# Altium PCB PCB1.PcbDoc
Units mil, origin at the board's own origin, x right, y up, seen from the top; angles counter-clockwise.
Board outline 3401.25 x 3741.25 mil, 2 copper layers (Top Layer, Bottom Layer); 29 components, 44 nets, 178 pads, 45 vias.
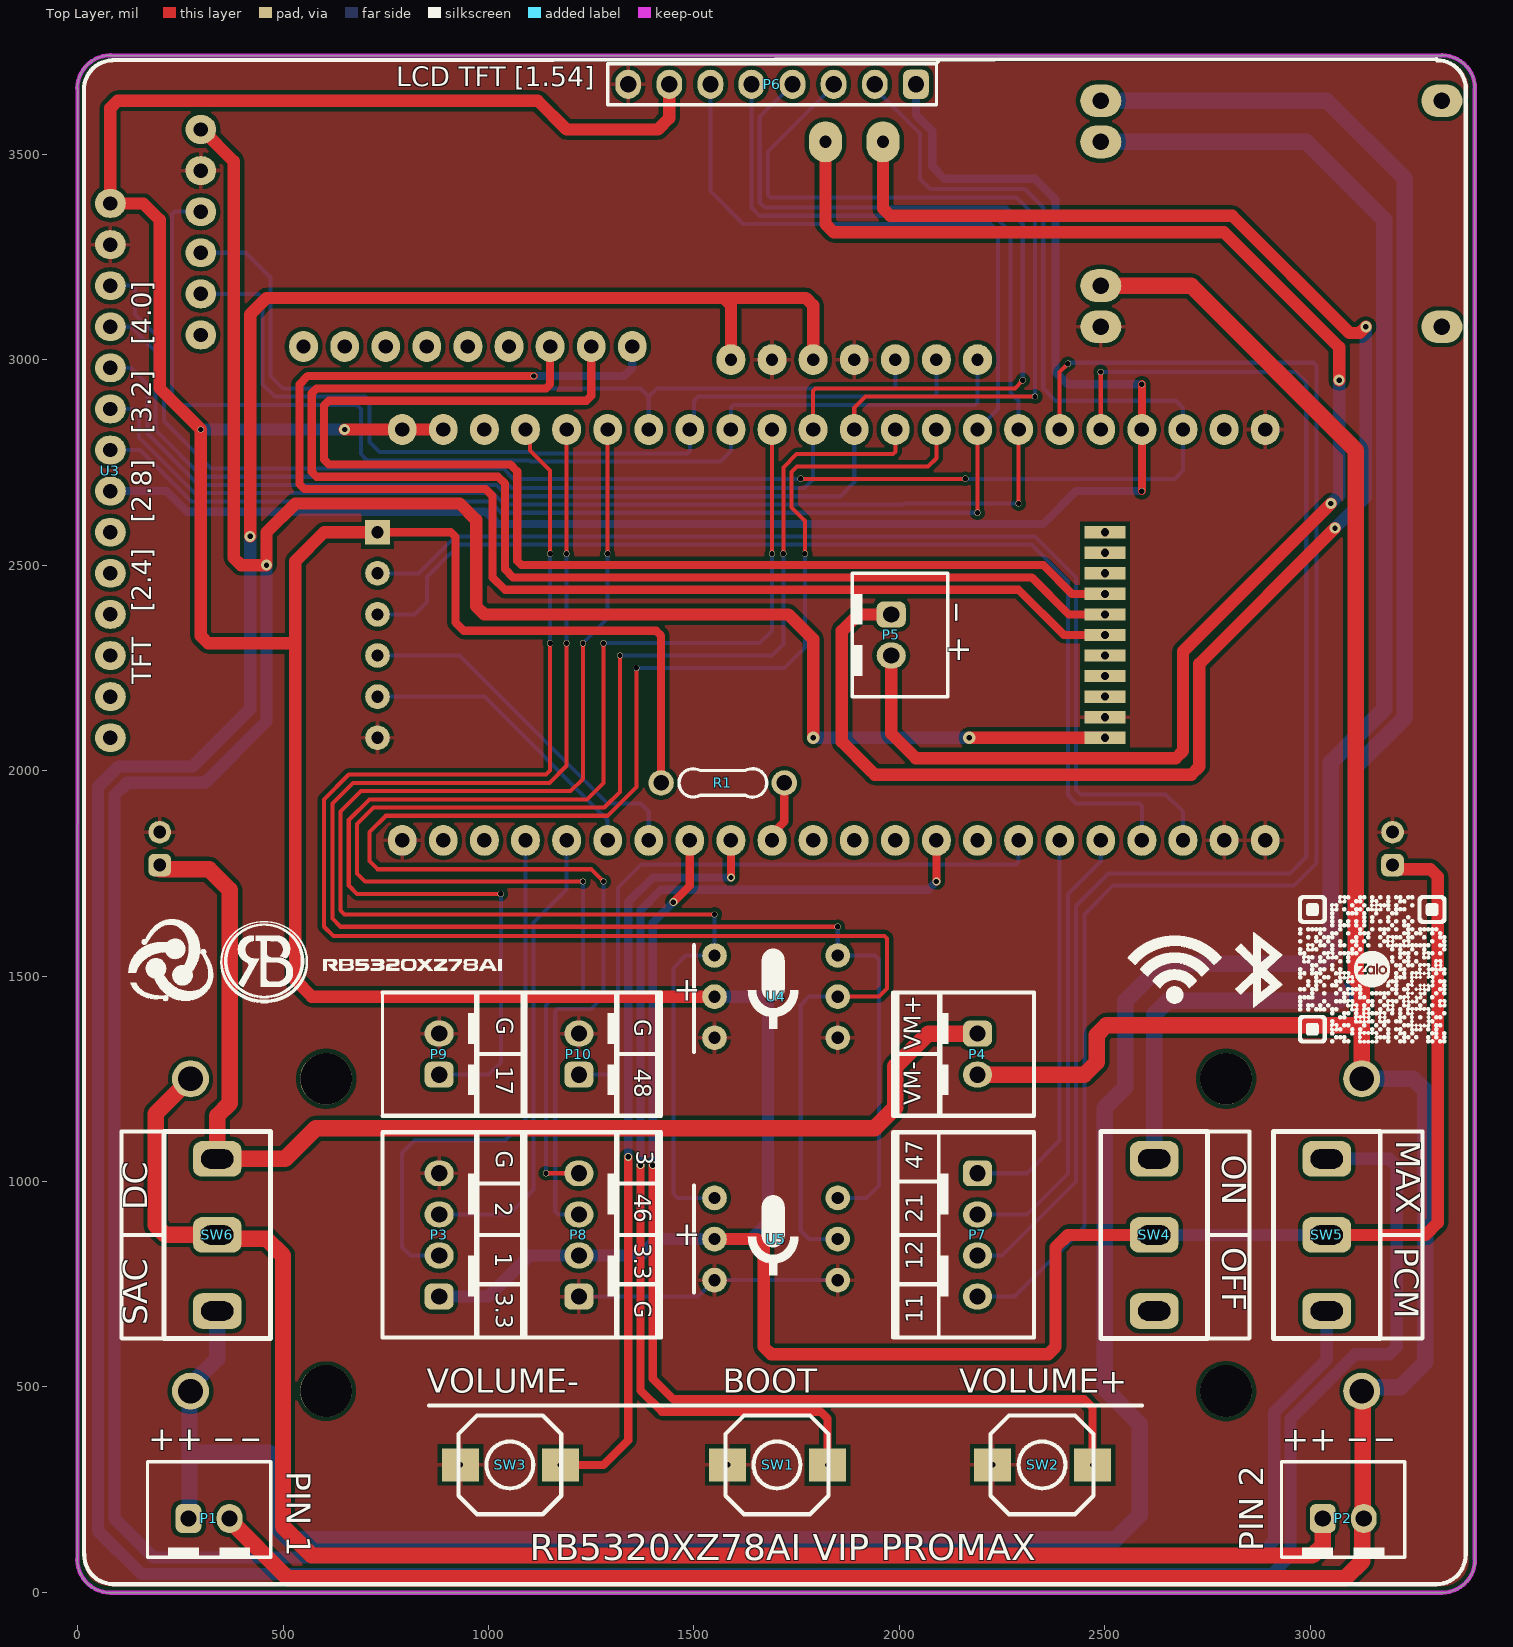
[diagram p0: Top Layer view]
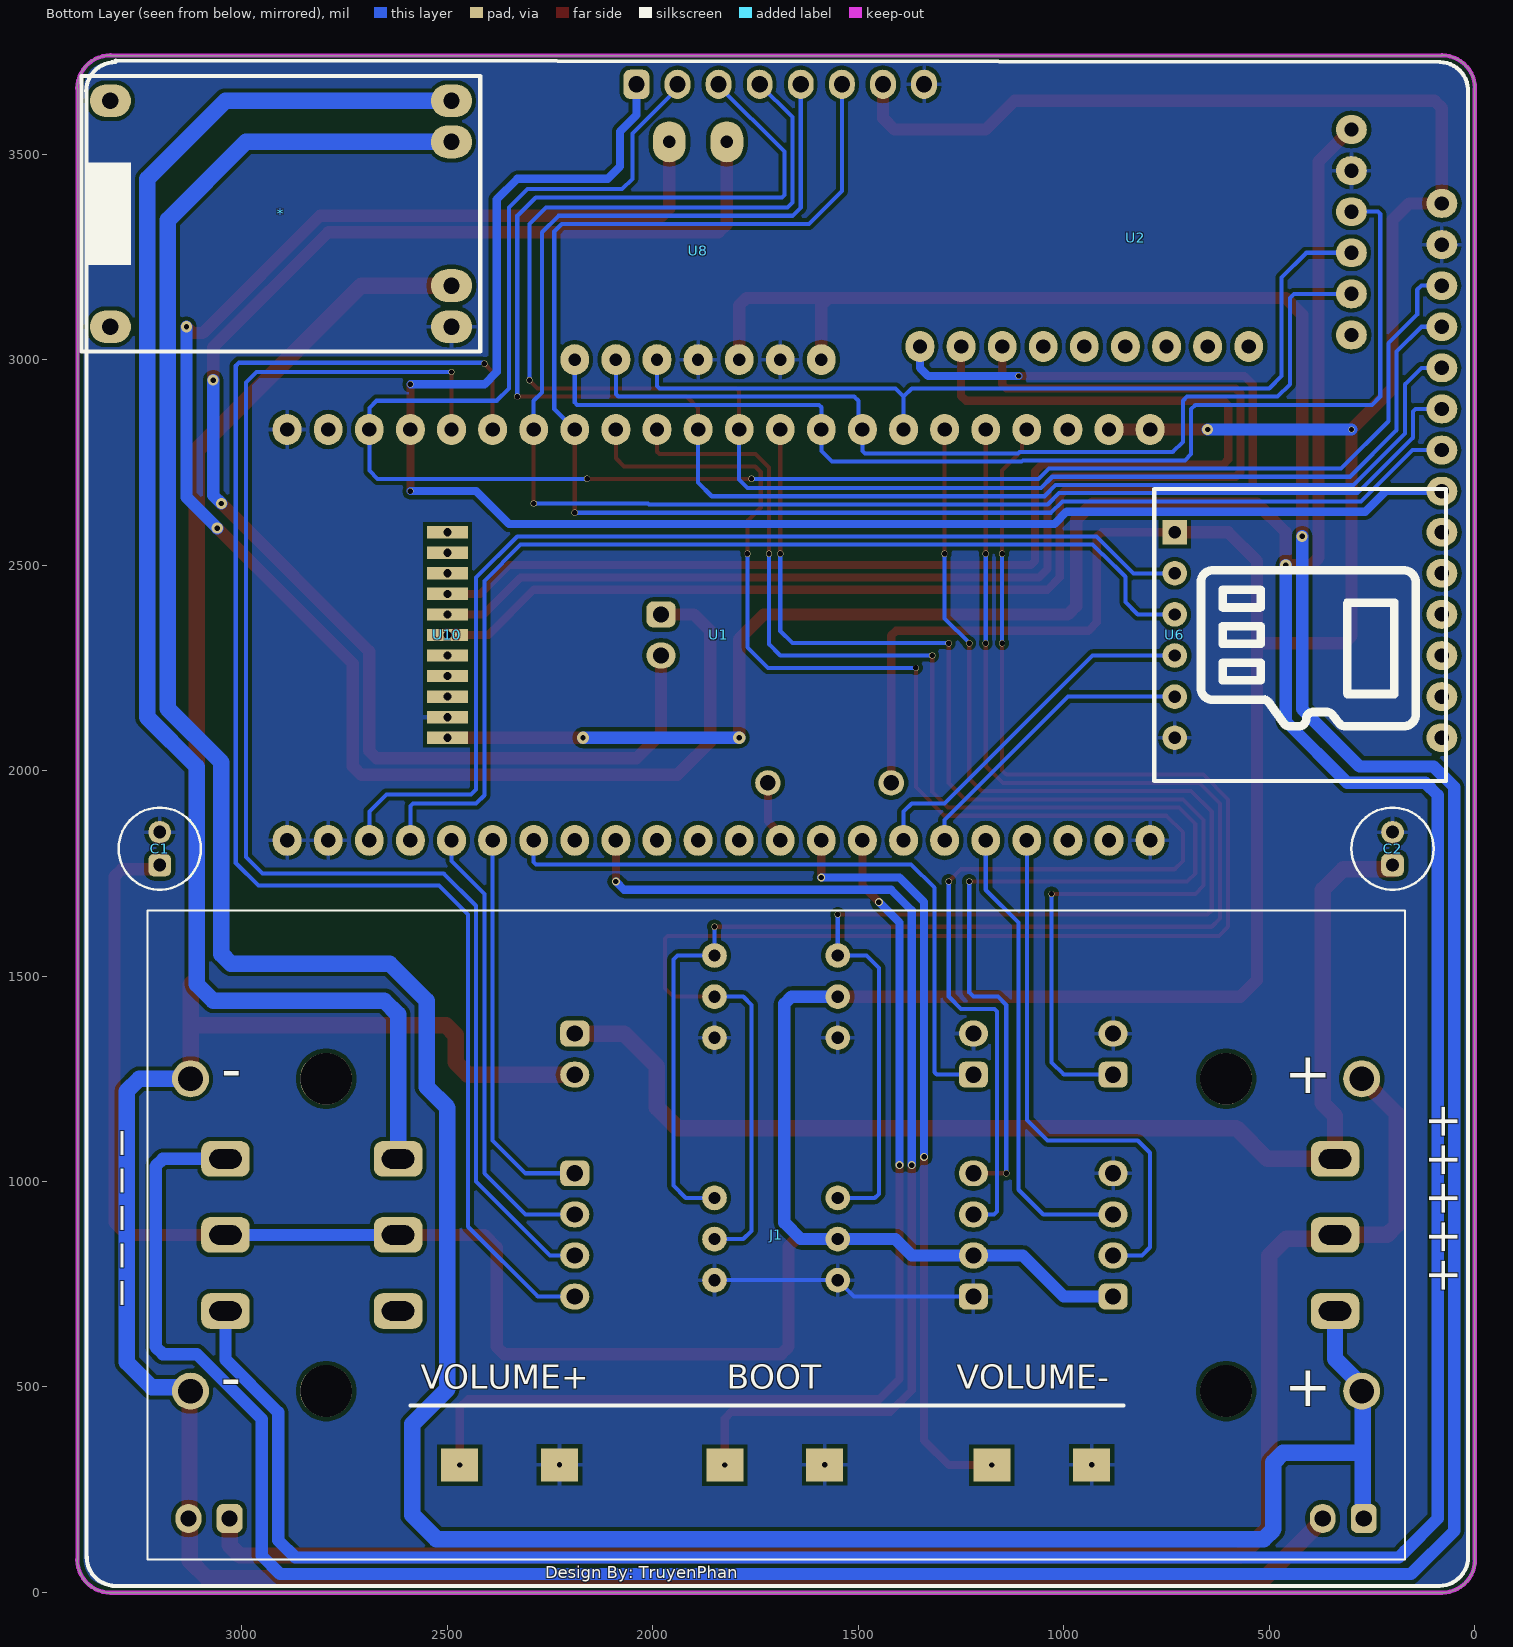
[diagram p1: Bottom Layer view, seen from below]

## Layer stack, top to bottom
Top Solder: solder mask 0.4, Solder Resist, Dk 3.5
Top Layer: signal copper 1.4
Dielectric 1: dielectric 12.6, FR-4, Dk 4.8
Bottom Layer: signal copper 1.4
Bottom Solder: solder mask 0.4, Solder Resist, Dk 3.5

## Board outline
-0.62,80 ccw(c80,80) 80,-0.62 3320,-0.62 ccw(c3320,80) 3400.62,80 3400,80 3400,3660 3400.62,3660 ccw(c3320,3660) 3320,3740.62 3320,3740 80,3740 80,3740.62 ccw(c80,3660) -0.62,3660 0,3660

## Design rules (kind name [scope] priority, off if disabled: settings)
Clearance [All] p1: gap=10 ignorepadtopadclearanceinfootprint=FALSE except(0: Arc-Hole Track-Hole SMDPad-Hole THPad-Hole Via-Hole Fill-Hole Poly-Hole Region-Hole Text-Hole)
PolygonConnect [All] p1: connectstyle=Relief reliefconductorwidth=10 reliefentries=4 polygonreliefangle="90 Angle" airgapwidth=10
RoutingVias [All] p1: holewidth=13 width=15 viastyle="Through Hole" minholewidth=13 minwidth=15 maxholewidth=13 maxwidth=15
SolderMaskExpansion [IsVia] p1: expansion=-1 istentingtop=FALSE
Width [All] p1: maxlimit=40 minlimit=10 preferedwidth=20
30 further rules are at their usual default settings.

## Components (designator, comment, footprint, x,y, rotation, side; value= is the part's Value field where it differs from the comment)
* "MACH_SAC_5V" TP4056 3320,3080 r90 bottom
C1 "C" CYL/D.200/LS.75 3200,1810 r90 bottom
C2 "C" CYL/D.200/LS.75 200,1810 r90 bottom
J1 "BK-18650-PC4" 18650-PC4 1700,870 r0 bottom
P1 "PIN" HDR/Header/2/BOX 320,180 r90 top
P2 "PIN" HDR/Header/2/BOX 3080,180 r90 top
P3 "HC_SR04" HDR/Header/4/BOX 880,870 r90 top
P4 "PWR_DC" HDR/Header/2/BOX 2190,1310 r0 top
P5 "LOA" HDR/Header/2/BOX 1980,2330 r0 top
P6 "Header 8" HDR/Header/8 1690,3670 r180 top
P7 "PWM" HDR/Header/4/BOX 2190,870 r270 top
P8 "OLED" HDR/Header/4/BOX 1220,870 r90 top
P9 "LED1" HDR/Header/2/BOX 880,1310 r180 top
P10 "LED2" HDR/Header/2/BOX 1220,1310 r180 top
R1 "10K" "R 1/4W/300" 1420,1970 r0 top
SW1 "Button 2pin" Button2Psilicon 1582.05,310.37 r0 top
SW2 "Button 2pin" Button2Psilicon 2227.05,310.37 r0 top
SW3 "Button 2pin" Button2Psilicon 932.05,310.37 r0 top
SW4 "POWER" SW/3/SPDT/SS12D10 2620,870 r90 top
SW5 "LOA_CHANGE" SW/3/SPDT/SS12D10 3040,870 r90 top
SW6 "SPL" SW/3/SPDT/SS12D10 340,870 r90 top
U1 "ESP32_S3_MODULE" ESP32_S3_MODULE 2890,2830 r180 bottom
U2 "PCM5102" PCM5102 1350,3032 r90 bottom
U3 "TFT28" "TFT - duplicate" 80,2080 r90 top
U4 "MIC_IMP441" IMP441 1550,1550 r0 top
U5 "MIC_IMP441" IMP441 1550,960 r0 top
U6 "SD CARD" SDCARD_MODULE 730,2580 r180 bottom
U8 "MAX98357" MAX98357 2190,3000 r180 bottom
U10 "BLUETOOTH" BLE 2500,2080 r90 bottom

## Footprints (in the part's own frame and the unit in brackets; to place one, negate y for a bottom-side part, rotate by r counter-clockwise, add the part's x,y. Pads: shape width x height; smd on the part's side, far side on the other; paste and mask are expansions set on the pad)
18650-PC4 [mil]
  round 90 hole 60: +1(-1425,380) +2(-1425,-380) -1(1425,380) -2(1425,-380)
  round 126 hole 126 unplated: ""(-1095,-380) ""(-1095,380) ""(1095,-380) ""(1095,380)
  silkscreen extent -1530,-790 1530,790, body extent -1530,-792 1530,792, height 974
BLE [mil]
  rect 30x100 hole 20: 0(0,0) 1(50,0) 2(100,0) 3(150,0) 4(200,0) 5(250,0) 6(300,0) 7(350,0) 8(400,0) 9(450,0) 10(500,0)
  body extent -45,-29 546,875, height 116
Button2Psilicon [mil]
  rect 90x80 hole 13: 1(0,0) 2(242.95,-0.37)
  silkscreen extent -5,-120 245,120, body extent -4,-116 244,116, height 195
CYL/D.200/LS.75 [mm]
  rrect50% 1.4x1.4 hole 0.8: 1(-1.016,0)
  round 1.4 hole 0.8: 2(1.016,0)
  silkscreen extent -2.54,-2.54 2.54,2.54, body extent -2.5,-2.5 2.5,2.5, height 11
ESP32_S3_MODULE [mil]
  oval 70x75 hole 35: 0(0,0) 1(100,0) 2(200,0) 3(300,0) 4(400,0) 5(500,0) 6(600,0) 7(700,0) 8(800,0) 9(900,0) 10(1000,0) 11(1100,0) 12(1200,0) 13(1300,0) 14(1400,0) 15(1500,0) 16(1600,0) 17(1700,0) 18(1800,0) 19(1900,0) 20(2000,0) 21(2100,0) 22(0,-1000) 23(100,-1000) 24(200,-1000) 25(300,-1000) 26(400,-1000) 27(500,-1000) 28(600,-1000) 29(700,-1000) 30(800,-1000) 31(900,-1000) 32(1000,-1000) 33(1100,-1000) 34(1200,-1000) 35(1300,-1000) 36(1400,-1000) 37(1500,-1000) 38(1600,-1000) 39(1700,-1000) 40(1800,-1000) 41(1900,-1000) 42(2000,-1000) 43(2100,-1000)
  body extent -100,-1050 2421,50, height 426
HDR/Header/2/BOX [mm]
  rrect50% 1.8x1.6 hole 1: 1(0,1.27)
  oval 1.8x1.6 hole 1: 2(0,-1.27)
  silkscreen extent -2.41,-3.81 3.5,3.81, body extent -2.35,-3.7 3.4,3.7, height 7
HDR/Header/4/BOX [mm]
  rrect50% 1.6x1.8 hole 1: 1(-3.81,0)
  oval 1.6x1.8 hole 1: 2(-1.27,0) 3(1.27,0) 4(3.81,0)
  silkscreen extent -6.35,-2.41 6.35,3.5, body extent -6.25,-2.3 6.25,3.4, height 7
HDR/Header/8 [mm]
  rrect50% 1.6x1.8 hole 1: 1(-8.89,0)
  oval 1.6x1.8 hole 1: 2(-6.35,0) 3(-3.81,0) 4(-1.27,0) 5(1.27,0) 6(3.81,0) 7(6.35,0) 8(8.89,0)
  silkscreen extent -10.29,-1.4 10.16,1.27, body extent -10.16,-1.27 10.16,1.27, height 8.89
IMP441 [mil]
  round 60 hole 30: 0(0,0) 1(0,-100) 2(0,-200) 3(300,0) 4(300,-100) 5(300,-200)
  body extent -122,-382 420,178, height 411
MAX98357 [mil]
  oval 70x75 hole 30: 0(0,0) 1(100,0) 2(200,0) 3(300,0) 4(400,0) 5(500,0) 6(600,0)
  oval 80x100 hole 30: 7(230,530) 8(370,530)
  body extent -54,-99 654,665, height 656
PCM5102 [mil]
  oval 75x70 hole 35: 0(0,0) 1(0,-100) 2(0,-200) 3(0,-300) 4(0,-400) 5(0,-500) 6(0,-600) 7(0,-700) 8(0,-800)
  oval 70x75 hole 35: 9(28,-1050) 10(128,-1050) 11(228,-1050) 12(328,-1050) 13(428,-1050) 14(528,-1050)
  body extent -66,-1112 686,140, height 529
"R 1/4W/300" [mil] "Through hole resitor, axial 300mils, 1/4W"
  round 62 hole 38: 1(0,0) 2(300,0)
  silkscreen extent 44,-35 257,35, body extent -12,-47 312,47, height 97
SDCARD_MODULE [mil]
  rect 60x60 hole 30: 1(0,0)
  round 60 hole 30: 2(0,-100) 3(0,-200) 4(0,-300) 5(0,-400) 6(0,-500)
  silkscreen extent -50,-605 660,105, body extent -51,-606 761,107, height 133
SW/3/SPDT/SS12D10 [mm]
  rrect50% 2.2x3 hole 1.2 slot 2 at 90 deg: 1(-4.7,0) 2(0,0) 3(4.7,0)
  silkscreen extent -6.4,-3.3 6.4,3.3, body extent -6.4,-3.3 6.35,3.8, height 12.5
"TFT - duplicate" [mil]
  oval 70x75 hole 35: 1(1300,0) 2(1200,0) 3(1100,0) 4(1000,0) 5(900,0) 6(800,0) 7(700,0) 8(600,0) 9(500,0) 10(400,0) 11(300,0) 12(200,0) 13(100,0) 14(0,0)
  body extent -335,-3311 1635,75, height 332
TP4056 [mil]
  oval 80x100 hole 40: 0(0,0) 1(550,0) 2(0,-830) 3(100,-830) 4(450,-830) 5(550,-830)
  silkscreen extent -60,-900 610,70, body extent -66,-1044 620,109, height 163

## Part data
C1 C2: library part Capacitor, "Capacitor pol"
J1: "Battery Holder (Open) 18650 2 Cell PC Pin", Package=None, Check_prices=https://www.snapeda.com/parts/BK-18650-PC4/Memory+Protection+Devices/view-part/?ref=eda, MF="MPD (Memory Protection Devices)", MP=BK-18650-PC4, SnapEDA_Link=https://www.snapeda.com/parts/BK-18650-PC4/Memory+Protection+Devices/view-part/?ref=snap
P1 P2 P4 P5 P9 P10: library part "Header 2", "Header, 2-Pin"
P3 P7 P8: library part "Header 4", "Header, 4-Pin"
P6: "Header, 8-Pin"
R1: library part Resistor, "Resistor"
SW1 SW2 SW3: library part "Silicone 2P button SMD"
SW4 SW5 SW6: library part "SW SPDT"
U6: library part "SD Card Module"

## Via types
v1: diameter 15, hole 13, Top Layer to Bottom Layer, 30 vias
v2: diameter 27, hole 13, Top Layer to Bottom Layer, 7 vias
v3: diameter 19, hole 13, Top Layer to Bottom Layer, 6 vias
v4: diameter 30, hole 13, Top Layer to Bottom Layer, 2 vias

## Nets (pads, with @x,y where several pads share a name; then routed paths per layer and width w, separated by ;. In a path a pad name is that pad's centre, name@x,y a point inside that pad or via, vN(x,y) a via of type N, cw(c..) or ccw(c..) an arc to the next point about the centre after c; other vN are vias at no path point)
3.3: C1.1 P3.1 P6.7 P8.2 R1.1 SW4.2 SW5.2 U1.20 U1.21 U3.1 U4.1 U5.1 U6.1 | length 12098.3
  Top Layer w20: U6.1 908.28,2580 920,2568.28 920,2360 940,2340 1408.28,2340 1420,2328.28 R1.1
  Top Layer w30: v2(650,2830) U1.21 U1.20 ; U6.1 600,2580 530,2510 530,2310 ; P6.7 1440,3587.57 1412.43,3560 1190,3560 1120,3630 97.57,3630 80,3612.43 U3.1 160,3380 200,3340 200,2930 v1(300,2830) 300,2327.57 317.57,2310 530,2310 ; U5.1 1652.43,860 1670,842.43 1670,597.57 1687.57,580 2362.43,580 2380,597.57 2380,840 2410,870 SW4.2 ; U4.1 570,1450 530,1490 530,2310 ; SW5.2 3280,870 3310,900 3310,1742.43 3292.43,1760 C1.1@3200,1760
  Bottom Layer w30: v1(300,2830) v2(650,2830) ; P3.1 1000,720 1100,820 P8.2 1370,820 1410,860 U5.1 1640,860 1680,900 1680,1432.43 1662.43,1450 U4.1 ; SW4.2 SW5.2
3.3MAX: SW5.3 U8.4 U8.6 | length 9146.5
  Top Layer w30: v2(420,2570) 420,3110 460,3150 1572.43,3150 ; U8.6 1590,3132.43 1572.43,3150 ; U8.4 1790,3132.43 1772.43,3150 1572.43,3150
  Bottom Layer w30: v2(420,2570) 420,2150 280,2010 100,2010 50,1960 50,150 155,45 2907.43,45 2951.72,89.29 2951.72,421.72 3110,580 3192.43,580 3210,597.57 3210,1037.47 3192.43,1055.04 SW5.3
3.3PCM: SW5.1 U2.14 U10.0 | length 9887.3
  Top Layer w30: U2.14 302.5,3560 380,3482.5 380,2517.57 397.57,2500 v2(460,2500) 460,2580 530,2650 930,2650 970,2610 970,2400 990,2380 1730,2380 1790,2320 v4(1790,2080) ; v4(2170,2080) U10.0
  Bottom Layer w30: v2(460,2500) 460,2120 310,1970 120,1970 90,1940 90,180 170.01,99.99 185,85 2870,85 2911.72,126.72 2911.72,438.28 3040,566.57 SW5.1 ; v4(1790,2080) v4(2170,2080)
AGND: U2.1 U10.7 | length 3074.8
  Top Layer w20: U2.1 1250,2911.72 1238.28,2900 611.72,2900 600,2888.28 600,2756.72 611.72,2745 1053.28,2745 1070,2728.28 1070,2510 1080,2500 2350,2500 2420,2430 U10.7
BCK: U1.14 U2.10 U8.1 | length 2342.2
  Bottom Layer w10: U2.10 440,3160 450,3150 450,2940 480,2910 700,2910 710,2900 710,2800 735,2775 1107.89,2775 1111.25,2771.64 1484.14,2771.64 1490,2777.5 U1.14 1500,2840 1500,2900 1510,2910 2084.14,2910 2090,2915.86 U8.1
BL: P6.1 U1.3 U3.8 | length 4028.4
  Top Layer w20: v1(2590,2680) U1.3 v1(2590,2940)
  Bottom Layer w20: U3.8 216.36,2680 266.36,2630 524.14,2630 992.9,2630 1022.9,2600 2350,2600 2430,2680 v1(2590,2680) ; P6.1 2040,3595.36 2080,3555.36 2080,3470 2110,3440 2330,3440 2380,3390 2380,2970 2410,2940 v1(2590,2940)
BOOT: SW1.2 U1.30 | length 2613.9
  Top Layer w20: v3(1370,1040) 1370,491.72 1421.72,440 1808.28,440 1825,423.28 SW1.2 ; v3(2090,1730) U1.30
  Bottom Layer w20: v3(1370,1040) 1370,1660 1420,1710 2070,1710 v3(2090,1730)
CS: P6.2 U1.2 U3.3 | length 4516.1
  Top Layer w10: v1(1760,2710) v1(2160,2710)
  Bottom Layer w10: U3.3 130,3180 140,3170 140,3110 210,3040 210,2850 325,2735 1036.39,2735 1061.39,2710 v1(1760,2710) ; P6.2 1940,3660 2050,3550 2050,3440 2075,3415 2305,3415 2350,3370 2350,2930 2380,2900 2672.5,2900 2690,2882.5 U1.2 2690,2730 2670,2710 v1(2160,2710)
DC: P6.3 U1.10 U3.5 | length 4103.1
  Top Layer w10: U1.10 1890,2882.5 1917.5,2910 v1(2330,2910)
  Bottom Layer w10: U3.5 130,2980 170,2940 170,2820 295,2695 1019.83,2695 1047.33,2667.5 1856.64,2667.5 1890,2700.86 U1.10 ; P6.3 1840,3666.06 1680,3506.06 1680,3400.86 1685.86,3395 2285,3395 2330,3350 v1(2330,2910)
DC_POWER: C2.1 P4.1 SW6.3 | length 2893
  Top Layer w40: C2.1@200,1760 320,1760 370,1710 370,1190 340,1160 SW6.3 505.04,1055.04 580,1130 1940,1130 1990,1180 1990,1280 2070,1360 P4.1
DIN: U1.15 U2.11 U8.2 | length 2130.4
  Bottom Layer w10: U2.11 410,3260 470,3200 470,2960 500,2930 1370,2930 1390,2910 ; U1.15 1390,2910 ; U8.2 1990,2935.86 1984.14,2930 1410,2930 1390,2910
GND: *.2 C1.2 C2.2 P3.4 P6.8 P8.1 P9.2 P10.2 SW1.1 SW2.1 SW3.1 U1.0 U1.22 U1.23 U1.43 U2.13 U3.2 U4.2 U4.5 U5.2 U5.5 U6.6 U8.3 U8.5 U10.1 | length 646.6
  Bottom Layer w10: P8.1 1510,720 U5.2 U5.5
GPIO_1: P3.2 U1.40 | length 1341.4
  Bottom Layer w10: P3.2 810,820 790,840 790,1070 820,1100 1040,1100 1090,1150 U1.40
GPIO_2: P3.3 U1.39 | length 1138
  Bottom Layer w10: P3.3 1050,920 1110,980 1110,1630 1190,1710 U1.39
GPIO_3: P8.4 U1.9 | length 3726.3
  Top Layer w10: v1(1140,1020) P8.4 ; v1(1230,1730) 700,1730 680,1750 680,1870 720,1910 1281.72,1910 1320,1948.28 v1(1320,2280) ; v1(1717.5,2527.5) 1717.5,2737.5 1750,2770 1984.14,2770 1990,2775.86 U1.9
  Bottom Layer w10: v1(1140,1020) 1140,1430 1160,1450 1220,1450 1230,1460 v1(1230,1730) ; v1(1320,2280) 1690,2280 1717.5,2307.5 v1(1717.5,2527.5)
GPIO_11: P7.4 U1.5 | length 3694.6
  Top Layer w10: U1.5 2390,2970 v1(2410,2990)
  Bottom Layer w10: P7.4 2280,720 2450,890 2450,1650 2520,1720 2960,1720 3015,1775 3015,2985 3007.5,2992.5 2413.85,2992.5 2411.35,2990 v1(2410,2990)
GPIO_12: P7.3 U1.4 | length 3399.7
  Top Layer w10: U1.4 v1(2490,2970)
  Bottom Layer w10: P7.3 2250,820 2430,1000 2430,1671.06 2508.94,1750 2950,1750 2990,1790 2990,2944.14 2964.14,2970 v1(2490,2970)
GPIO_17: P9.1 U1.12 | length 3020.4
  Top Layer w10: v1(1030,1700) 680,1700 660,1720 660,1880 710,1930 1240,1930 1280,1970 v1(1280,2310) ; v1(1690,2527.5) U1.12
  Bottom Layer w10: P9.1 1000,1260 1030,1290 v1(1030,1700) ; v1(1280,2310) 1660,2310 1690,2340 v1(1690,2527.5)
GPIO_19: U1.24 U6.2 | length 2647
  Bottom Layer w10: U6.2 830,2480 920,2570 2330,2570 2430,2470 2430,1954.14 2442.07,1942.07 2647.93,1942.07 2690,1900 U1.24
GPIO_20: U1.25 U6.3 | length 2619.7
  Bottom Layer w10: U6.3 820,2380 850,2410 850,2471.72 904.14,2525.86 905.86,2525.86 930,2550 2321.72,2550 2410,2461.72 2410,1940 2430,1920 2584.14,1920 2590,1914.14 U1.25
GPIO_21: P7.2 U1.26 | length 1104.6
  Bottom Layer w10: P7.2 2310,920 2410,1020 2410,1700 2490,1780 U1.26
GPIO_41: U1.37 U6.4 | length 887.4
  Bottom Layer w10: U6.4 930,2280 1290,1920 1370,1920 1390,1900 U1.37
GPIO_42: U1.38 U6.5 | length 734.3
  Bottom Layer w10: U6.5 990,2180 1290,1880 U1.38
GPIO_46: P8.3 U1.8 | length 3913.3
  Top Layer w10: v1(1280,1730) 1250,1760 730,1760 710,1780 710,1850 750,1890 1290,1890 1360,1960 v1(1360,2250) ; v1(1770,2527.5) 1770,2607.84 1737.5,2640.34 1737.5,2726.69 1750.81,2740 2070,2740 2090,2760 U1.8
  Bottom Layer w10: P8.3 1169.57,920 1162.5,927.07 1162.5,1414.14 1168.36,1420 1250,1420 1280,1450 v1(1280,1730) ; v1(1360,2250) 1720,2250 1770,2300 v1(1770,2527.5)
GPIO_47: P7.1 U1.27 | length 963.1
  Bottom Layer w10: P7.1 2310,1020 2390,1100 U1.27
GPIO_48: P10.1 U1.28 | length 1600
  Bottom Layer w10: P10.1 1309.14,1260 1315,1265.86 1315,1715 1371.64,1771.64 2284.14,1771.64 2290,1777.5 U1.28
LCK: U1.13 U2.12 U8.0 | length 2832.9
  Bottom Layer w10: U2.12 235.86,3360 230,3354.14 230,2910 250,2890 680,2890 690,2880 690,2770 705,2755 1099.61,2755 1102.97,2751.64 1564.14,2751.64 1590,2777.5 1590,2884.14 1595.86,2890 2184.14,2890 2190,2895.86 U8.0
LOA+: P5.2 U8.8 | length 3646.2
  Top Layer w30: U8.8 1820,3330 1840,3310 2790,3310 3070,3030 v2(3070,2950) ; P5.2 1980,2090 2040,2030 2672.43,2030 2690,2047.57 2690,2290 v2(3050,2650)
  Bottom Layer w30: v2(3050,2650) 3070,2670 v2(3070,2950)
LOA-: P5.1 U8.7 | length 4024.8
  Top Layer w30: U8.7 1960,3367.57 1977.57,3350 2810,3350 3095.07,3064.93 3119.93,3064.93 v2(3135,3080) ; P5.1 1900,2380 1860,2340 1860,2070 1930.01,1999.99 1940,1990 2710,1990 2730,2010 2730,2260 v2(3060,2590)
  Bottom Layer w30: v2(3060,2590) 3135,2665 v2(3135,3080)
LROUT: U2.0 U10.5 | length 3349.9
  Top Layer w20: v1(1110,2960) 560,2960 540,2940 540,2696.72 551.72,2685 993.28,2685 1010,2668.28 1010,2470 1040,2440 2290,2440 2400,2330 U10.5
  Bottom Layer w20: v1(1110,2960) 1330,2960 1350,2980 U2.0
MIC_SCK: U1.17 U4.3 U5.3 | length 3781.1
  Top Layer w10: v1(1190,2310) 1190,2011.72 1148.28,1970 670,1970 620,1920 620,1640 640,1620 v1(1850,1620) ; v1(1190,2527.5) U1.17
  Bottom Layer w10: v1(1190,2310) v1(1190,2527.5) ; U5.3 1920,960 1950,990 1950,1540 1940,1550 U4.3 v1(1850,1620)
MIC_SD: U1.16 U4.0 U5.0 | length 3518.7
  Top Layer w10: v1(1230,2310) 1230,1980 1200,1950 690,1950 640,1900 640,1660 650,1650 v1(1550,1650) ; v1(1290,2527.5) U1.16
  Bottom Layer w10: v1(1230,2310) 1290,2370 v1(1290,2527.5) ; U5.0 1460,960 1450,970 1450,1520 1480,1550 U4.0 v1(1550,1650)
MIC_WS: U1.18 U4.4 U5.4 | length 4122.1
  Top Layer w10: U1.18 1101.48,2818.52 1101.48,2778.52 1150,2730 v1(1150,2527.5) ; v1(1150,2310) 1150,2000 1140,1990 660,1990 600,1930 600,1670 600,1620 622.5,1597.5 1964.14,1597.5 1970,1591.64 1970,1470 1950,1450 U4.4
  Bottom Layer w10: v1(1150,2310) v1(1150,2527.5) ; U5.4 1780,860 1760,880 1760,1430 1780,1450 U4.4
Net*_5: *.5 SW4.3 | length 3700.4
  Bottom Layer w40: *.5 3040,3630 3230,3440 3230,2129.29 3110,2009.29 3110,1480 3070,1440 2653.43,1440 2620,1406.57 SW4.3
NetR1_2: R1.2 U1.34 | length 152.4
  Top Layer w20: U1.34 1690,1846.03 1720,1876.03 R1.2
PIN1+: *.4 J1.+1 P1.1 SW6.1 | length 7516.8
  Bottom Layer w40: P1.1 272.5,182.5 272.5,340 ; SW6.1 340,568.53 275,503.53 J1.+1 272.5,487.5 272.5,340 ; *.4 2990,3530 3180,3340 3180,2150 3050,2020 3050,1553.43 3026.57,1530 2640,1530 2550,1440 2550,1230 2500,1180 2500,495 2585,410 2585,188.43 2526.57,130 513.43,130 490,153.43 490,316.57 466.57,340 272.5,340
PIN2+: J1.+2 P2.1 SW6.2 | length 4026.5
  Top Layer w40: J1.+2 190,1165 190,893.43 213.43,870 SW6.2 349.06,860.94 459.06,860.94 500,820 500,160 570,90 3005,90 3030,115 P2.1
ROUT: U2.2 U10.6 | length 3068.2
  Top Layer w20: U2.2 1150,2940 1140,2930 581.72,2930 570,2918.28 570,2726.72 581.72,2715 1023.28,2715 1040,2698.28 1040,2490 1060,2470 2322.07,2470 2412.07,2380 U10.6
RST: P6.4 U1.11 U3.4 | length 4093.1
  Top Layer w10: U1.11 1790,2924.14 1795.86,2930 2281.11,2930 2300,2948.89 v1(2300,2950)
  Bottom Layer w10: U3.4 130,3080 190,3020 190,2828.28 303.28,2715 1028.11,2715 1055.61,2687.5 1769.32,2687.5 1790,2708.18 U1.11 ; P6.4 1660,3590 1660,3382.57 1672.57,3370 2260,3370 2300,3330 v1(2300,2950)
SCL: P6.6 U1.7 U3.7 | length 3878.8
  Top Layer w10: v1(2190,2627.5) U1.7
  Bottom Layer w10: U3.7 151.72,2780 276.72,2655 1003.26,2655 1030.76,2627.5 v1(2190,2627.5) ; P6.6 1540,3410 1620,3330 2221.72,3330 2240,3311.72 2240,2880 U1.7
SDA: P6.5 U1.6 U3.6 | length 3968.1
  Top Layer w10: v1(2290,2650) U1.6
  Bottom Layer w10: U3.6 144.14,2880 150,2874.14 150,2810 285,2675 1011.54,2675 1039.04,2647.5 2009.65,2647.5 2012.15,2650 v1(2290,2650) ; P6.5 1640,3370 1660,3350 2230,3350 2270,3310 2270,2920 2290,2900 U1.6
VIN-: *.3 J1.-1 J1.-2 P1.2 P2.2 P4.2 | length 7610.6
  Top Layer w40: P1.2 370,176.06 511.69,34.38 3084.38,34.38 3126.57,76.57 3126.57,176.57 P2.2 3127.5,182.5 3127.5,487.5 J1.-1 ; P4.2 2450,1260 2480,1290 2480,1356.57 2503.43,1380 3125,1380 ; *.3 2710,3180 3110,2780 3110,1493.43 3125,1478.43 3125,1380 ; J1.-2 3125,1380
  Bottom Layer w40: J1.-1 3134.57,499.57 3219.57,499.57 3280,560 3280,1220 3250,1250 J1.-2
VL+: SW2.2 U1.36 | length 2586.3
  Top Layer w20: v3(1400,1040) 1400,520 1450,470 2450,470 2470,450 SW2.2 ; v3(1450,1680) 1490,1720 U1.36
  Bottom Layer w20: v3(1400,1040) 1400,1630 v3(1450,1680)
VL-: SW3.2 U1.35 | length 1864.7
  Top Layer w20: SW3.2 1280,310 1340,370 v3(1340,1060) ; v3(1590,1740) U1.35
  Bottom Layer w20: v3(1340,1060) 1340,1680 1400,1740 v3(1590,1740)
pads on no net: *.0 *.1 J1. SW4.1 U1.1 U1.19 U1.29 U1.31 U1.32 U1.33 U1.41 U1.42 U2.3 U2.4 U2.5 U2.6 U2.7 U2.8 U2.9 U3.9 U3.10 U3.11 U3.12 U3.13 U3.14 U10.2 U10.3 U10.4 U10.8 U10.9 U10.10

## Polygon pours and split planes (outlines as drawn)
GND on Top Layer "NONET_L-01_P-001" (solid, remove dead copper, pour order 0): 3895,-290 3925,-260 3925,3945 -410,3945 -560,3795 -160,3395 -160,-360
GND on Bottom Layer "NONET_L-01_P-001" (solid, remove dead copper, pour order 1): 4320,-555 4320,4270 -1105,4270 -1665,3710 -1340,3385 -1340,-405

## Keep-outs
Keep-Out Layer:
  lines w10: -0.62,80 ccw(c80,80) 80,-0.62 3320,-0.62 ccw(c3320,80) 3400.62,80 ; -0.62,3660 cw(c80,3660) 80,3740.62 ; 0,80 0,3660 ; 80,3740 3320,3740 ; 3320,3740.62 cw(c3320,3660) 3400.62,3660 ; 3400,80 3400,3660

## Silkscreen, mask and mechanical layers (free items; w line width, h text height)
Top Overlay:
  drawing of 237 lines, arcs and shapes, not listed
  text "LCD TFT [1.54]" at 775,3649.43 h80
  text "_" at 2142.3,2365 h100 r90
  text "+" at 2189.23,2260 h100 r90
  text "TFT   [2.4]   [2.8]   [3.2]   [4.0]" at 195.57,2210 h80 r90
  text "+" at 1450,1420.77 h100
  text "G" at 1005.83,1400 h70 r270
  text "G" at 1340.83,1395 h70 r270
  text "VM+" at 2065,1320 h70 r90
  text "17" at 1005,1280 h70 r270
  text "48" at 1340.83,1275 h70 r270
  text "VM-" at 2065,1185 h70 r90
  text "MAX" at 3190,1100 h100 r270
  text "G" at 1004.39,1075 h70 r270
  text "3" at 1345.83,1075 h70 r270
  text "ON" at 2766.18,1065 h100 r270
  text "47" at 2070,1030 h70 r90
  text "46" at 1340.83,970 h70 r270
  text "2" at 1003.56,950 h70 r270
  text "DC" at 188.89,930 h100 r90
  text "21" at 2070,900 h70 r90
  text "3.3" at 1340.83,850 h70 r270
  text "OFF" at 2766.18,840 h100 r270
  text "PCM" at 3186.11,840 h100 r270
  text "1" at 1003.56,826.46 h70 r270
  text "+" at 1450,825.77 h100
  text "12" at 2070,785 h70 r90
  text "3.3" at 1004.39,730 h70 r270
  text "G" at 1340.83,710 h70 r270
  text "11" at 2070,655 h70 r90
  text "SAC" at 188.82,650 h100 r90
  text "VOLUME-" at 850,466.18 h100
  text "BOOT" at 1570,466.18 h100
  text "VOLUME+" at 2145,466.18 h100
  text "_ _" at 336.53,368.15 h100
  text "_ _" at 3095,367.7 h100
  text "++" at 171.53,326.23 h100
  text "++" at 2930,325.77 h100
  text "PIN 1" at 490,295 h100 r270
  text "PIN 2" at 2905,100 h100 r90
  text "RB5320XZ78AI VIP PROMAX" at 1100,55.92 h110
Bottom Overlay:
  drawing of 14 lines, arcs and shapes, not listed
  text "+++++" at 137.93,725 h140 r90
  text "_ _ _ _ _" at 3295.21,700 h140 r90
  text "VOLUME-" at 1260,476.18 h100
  text "BOOT" at 1820,476.18 h100
  text "VOLUME+" at 2565,476.18 h100
  text "Design By: TruyenPhan" at 2261.5,25 h50
Bottom Paste:
  lines w10: 853.85,453.88 2588.85,453.88

## Text inside footprints (layer, text, board x,y; h text height)
J1: Bottom Overlay "-" at 3000.12,1300.04 h100.01 r180; Bottom Overlay "-" at 3001.13,549.72 h100.09 r180; Bottom Overlay "+" at 348.12,1300.6 h100.14 r180; Bottom Overlay "+" at 348.24,539.57 h100.13 r180